# Altium PCB PCI Express_16765X6890_64PIN_Low profile.PCBDOC (part 3 of 5)
Units mm, origin at the board's own origin, x right, y up, seen from the top; angles counter-clockwise.
Board outline 167.65 x 68.9 mm, 6 copper layers (TopLayer, AGround_Layer, InternalPlane1, Power_Layer, Ground_Layer, BottomLayer), stack 1.141 mm thick; 897 components, 648 nets, 2942 pads, 321 vias.
Unrouted connection lines stored in the file: 1996.
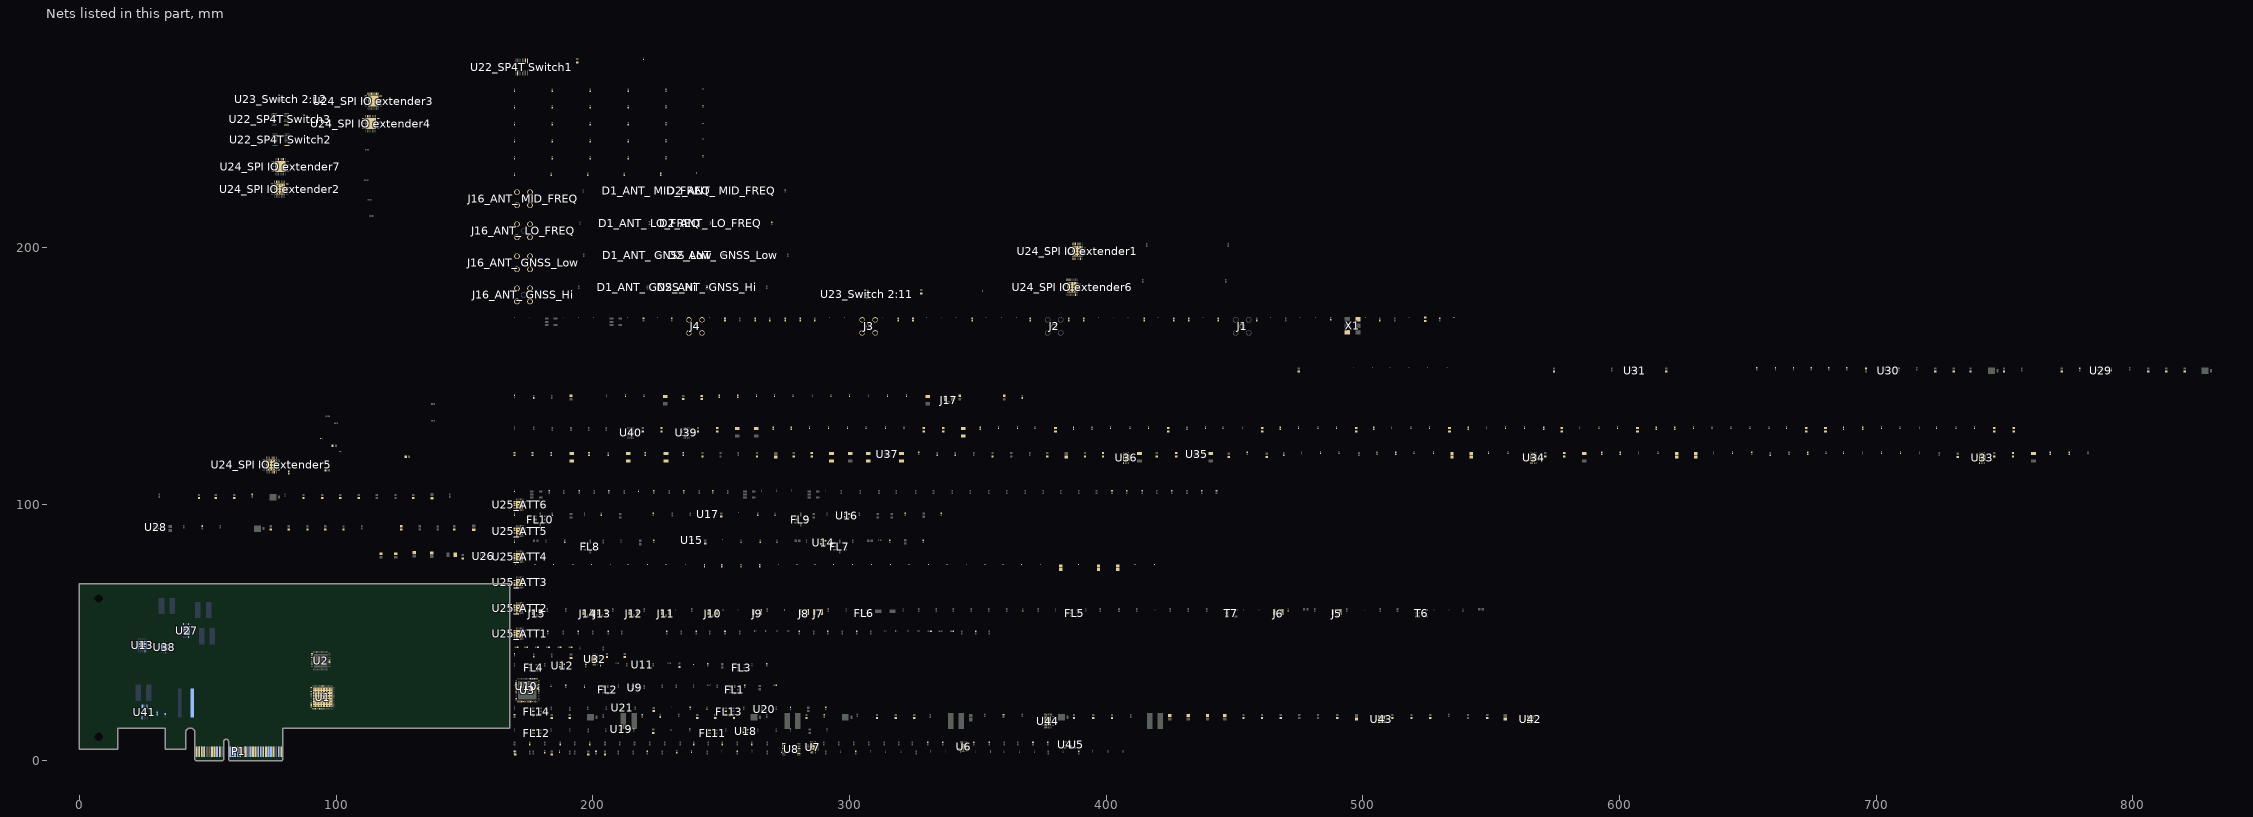
[diagram p5: the nets of this part, all layers, seen from the top]

## Footprints (in the part's own frame and the unit in brackets; to place one, negate y for a bottom-side part, rotate by r counter-clockwise, add the part's x,y. Pads: shape width x height; smd on the part's side, far side on the other; paste and mask are expansions set on the pad) (continued)
"MAX2771 T2855-8" [mm] "MAX2771 T2855-8 QFN, 28-Leads, Body 5,00x5,00mm, Pitch 0,50mm, Thermal Pad 3,25x3,25mm, IPC Medium Density"
  oval 0.95x0.3 smd: 1(-2.34,1.5) 2(-2.34,1) 3(-2.34,0.5) 4(-2.34,0) 5(-2.34,-0.5) 6(-2.34,-1) 7(-2.34,-1.5) 15(2.34,-1.5) 16(2.34,-1) 17(2.34,-0.5) 18(2.34,0) 19(2.34,0.5) 20(2.34,1) 21(2.34,1.5)
  oval 0.3x0.95 smd: 8(-1.5,-2.34) 9(-1,-2.34) 10(-0.5,-2.34) 11(0,-2.34) 12(0.5,-2.34) 13(1,-2.34) 14(1.5,-2.34) 22(1.5,2.34) 23(1,2.34) 24(0.5,2.34) 25(0,2.34) 26(-0.5,2.34) 27(-1,2.34) 28(-1.5,2.34)
  rect 3.25x3.25 smd: 29(0,0)
  silkscreen extent -3.43,-2.65 2.65,2.65, body extent -2.52,-2.52 2.52,2.52, height 0.8
ODS-1415 [mm] "MADP-011029-14150T, PSON, 6-Leads, Body 1,20x1,50mm, Pitch 0,40mm, Thermal Pad 0,85x0,42mm, IPC Medium Density"
  rect 0.4x0.2 smd: 1(-0.65,0.4) 2(-0.65,0) 3(-0.65,-0.4) 4(0.65,-0.4) 5(0.65,0) 6(0.65,0.4)
  rect 0.42x0.85 smd: 7(0,0)
  silkscreen extent -1.11,0.66 -1.01,0.76, body extent -0.75,-0.6 0.75,0.6, height 0.6
PCIeX4-GF-2D-1000-1K-O64 [mm] "Golden finger, PCIeX4, Dual, Opposite, Pitch 1mm, 64-Position"
  rect 0.7x3.2 smd far side paste-1: A1(-9.5,0.5)
  rect 0.7x4.2 smd far side paste-1: A2(-8.5,0) A3(-7.5,0) A4(-6.5,0) A5(-5.5,0) A6(-4.5,0) A7(-3.5,0) A8(-2.5,0) A9(-1.5,0) A10(-0.5,0) A11(0.5,0) A12(3.5,0) A13(4.5,0) A14(5.5,0) A15(6.5,0) A16(7.5,0) A17(8.5,0) A18(9.5,0) A19(10.5,0) A20(11.5,0) A21(12.5,0) A22(13.5,0) A23(14.5,0) A24(15.5,0) A25(16.5,0) A26(17.5,0) A27(18.5,0) A28(19.5,0) A29(20.5,0) A30(21.5,0) A31(22.5,0) A32(23.5,0)
  rect 0.7x4.2 smd paste-1: B1(-9.5,0) B2(-8.5,0) B3(-7.5,0) B4(-6.5,0) B5(-5.5,0) B6(-4.5,0) B7(-3.5,0) B8(-2.5,0) B9(-1.5,0) B10(-0.5,0) B11(0.5,0) B12(3.5,0) B13(4.5,0) B14(5.5,0) B15(6.5,0) B16(7.5,0) B18(9.5,0) B19(10.5,0) B20(11.5,0) B21(12.5,0) B22(13.5,0) B23(14.5,0) B24(15.5,0) B25(16.5,0) B26(17.5,0) B27(18.5,0) B28(19.5,0) B29(20.5,0) B30(21.5,0) B32(23.5,0)
  rect 0.7x3.2 smd paste-1: B17(8.5,0.5) B31(22.5,0.5)
QFN-ML28_N [mm] "QFN, 28-Leads, Body 6x6mm, Pitch 0.65mm, Thermal Pad 4.2x4.2mm, IPC Medium Density"
  oval 1.05x0.3 smd: 1(-2.875,1.95) 2(-2.875,1.3) 3(-2.875,0.65) 4(-2.875,0) 5(-2.875,-0.65) 6(-2.875,-1.3) 7(-2.875,-1.95) 15(2.875,-1.95) 16(2.875,-1.3) 17(2.875,-0.65) 18(2.875,0) 19(2.875,0.65) 20(2.875,1.3) 21(2.875,1.95)
  oval 0.3x1.05 smd: 8(-1.95,-2.875) 9(-1.3,-2.875) 10(-0.65,-2.875) 11(0,-2.875) 12(0.65,-2.875) 13(1.3,-2.875) 14(1.95,-2.875) 22(1.95,2.875) 23(1.3,2.875) 24(0.65,2.875) 25(0,2.875) 26(-0.65,2.875) 27(-1.3,2.875) 28(-1.95,2.875)
  rect 4.2x4.2 smd: 29(0,0)
  silkscreen extent -3.97,-3.2 3.2,3.2, body extent -3.05,-3.05 3.05,3.05, height 1
"RES 0201/0603" [mm]
  rect 0.44x0.35 smd: 1(-0.325,0) 2(0.325,0)
  silkscreen extent -0.7,-0.33 0.7,0.33, body extent -0.3,-0.15 0.3,0.15, height 0.21
"RES 0402/1005 RF" [mm]
  rect 0.7x0.6 smd: 1(-0.45,0) 2(0.45,0)
  silkscreen extent -1.02,-0.51 1.02,0.51, body extent -0.5,-0.25 0.5,0.25, height 0.35
"RES 0603/1608" [mm]
  rect 0.85x0.95 smd: 1(-0.65,0) 2(0.65,0)
  silkscreen extent -1.27,-0.7 1.27,0.7, body extent -0.8,-0.4 0.8,0.4, height 0.45
"RES 0603/1608 RF" [mm]
  rect 0.75x0.85 smd: 1(-0.6,0) 2(0.6,0)
  silkscreen extent -1.2,-0.6 1.2,0.6, body extent -0.8,-0.4 0.8,0.4, height 0.45
"RES 1206/3216" [mm] "Chip Resistor, 2-Leads, Body 3.13x1.55mm, IPC Medium Density"
  rect 1.2x1.65 smd: 1(-1.4,0) 2(1.4,0)
  silkscreen extent -2.3,-1.1 2.3,1.1, body extent -1.57,-0.8 1.62,0.8, height 0.6
"RES 4320 Wide" [mm] "FCSL110, Chip Resistor, 2-Leads, Body 5,60x11,20mm, IPC Medium Density"
  rect 1.4x11.25 smd: 1(-2.475,0) 2(2.475,0)
  silkscreen extent -1.4,-5.53 1.4,5.53, body extent -2.8,-5.6 2.8,5.6, height 0.6
RGV16-2160X2160TP [mm] "QFN, 16-Leads, Body 4x4mm, Pitch 0.65mm, Thermal Pad 2.16x2.16mm, TI Recommended"
  oval 1x0.35 smd paste-0.025 mask+0.07: 1(-1.9,0.975) 2(-1.9,0.325) 3(-1.9,-0.325) 4(-1.9,-0.975) 9(1.9,-0.975) 10(1.9,-0.325) 11(1.9,0.325) 12(1.9,0.975)
  oval 0.35x1 smd paste-0.025 mask+0.07: 5(-0.975,-1.9) 6(-0.325,-1.9) 7(0.325,-1.9) 8(0.975,-1.9) 13(0.975,1.9) 14(0.325,1.9) 15(-0.325,1.9) 16(-0.975,1.9)
  rect 2.16x2.16 smd paste-1.08 mask+0.07: 17(0,0)
  KeepOutLayer region: -2.02,1.3 -1.3,1.3 -1.3,2.02 -2.02,2.02
  silkscreen extent -3,-2.22 2.22,2.22, body extent -2.07,-2.07 2.07,2.07, height 1
RGY0014A_V [mm] "QFN, 14-Leads, Body 3.5x3.5mm, Thermal Pad 2.05x2.05mm, TI Recommend"
  rect 0.85x0.28 smd paste-0.85 mask+0.07: 1(-1.725,-0.75) 7(1.725,-0.75) 8(1.725,0.75) 14(-1.725,0.75)
  rect 0.28x0.85 smd paste-0.85 mask+0.07: 2(-1,-1.725) 3(-0.5,-1.725) 4(0,-1.725) 5(0.5,-1.725) 6(1,-1.725) 9(1,1.725) 10(0.5,1.725) 11(0,1.725) 12(-0.5,1.725) 13(-1,1.725)
  rect 2.05x2.05 smd paste-2.05 mask+0.07: 15(0,0)
  silkscreen extent -2.82,-1.83 1.83,1.83, body extent -1.75,-1.75 1.75,1.75, height 1
RSV0016A [mm] "TXB0304RSVR, UQFN, 16-Leads, Body 1,80x2,60mm, Pitch 0,40mm, IPC Medium Density"
  oval 0.7x0.2 smd: 1(-0.8,0.6) 2(-0.8,0.2) 3(-0.8,-0.2) 4(-0.8,-0.6) 9(0.8,-0.6) 10(0.8,-0.2) 11(0.8,0.2) 12(0.8,0.6)
  oval 0.2x0.7 smd: 5(-0.6,-1.2) 6(-0.2,-1.2) 7(0.2,-1.2) 8(0.6,-1.2) 13(0.6,1.2) 14(0.2,1.2) 15(-0.2,1.2) 16(-0.6,1.2)
  silkscreen extent -1.27,1.58 -1.18,1.67, body extent -0.92,-1.33 0.92,1.33, height 0.55
SDB06A [mm] "SON, 6-Leads, Body 2.2x2.5mm, Pitch 0.65mm, NSC Recommended (SC-70 Land)"
  rect 0.6x0.25 smd paste-0.125 mask+0.051: 1(-1.15,0.65) 2(-1.15,0) 3(-1.15,-0.65) 4(1.15,-0.65) 5(1.15,0) 6(1.15,0.65)
  rect 0.75x1.2 smd paste-0.6 mask+0.051: 7(0,0)
  silkscreen extent -2.27,-1.3 1.6,1.45, body extent -1.3,-1.15 1.3,1.15, height 0.8
SDC08A [mm] "SON, 8-Leads, Body 4x4mm, Pitch 0.8mm, NSC Recommended"
  rect 0.6x0.3 smd paste-0.15 mask+0.051: 1(-1.9,1.2) 2(-1.9,0.4) 3(-1.9,-0.4) 4(-1.9,-1.2) 5(1.9,-1.2) 6(1.9,-0.4) 7(1.9,0.4) 8(1.9,1.2)
  rect 2.6x3 smd paste-1.5 mask+0.051: 9(0,0)
  silkscreen extent -3.02,-2.2 2.35,2.2, body extent -2.05,-2.05 2.05,2.05, height 0.8
SOT403-1 [mm] "SC18IS602B, TSSOP16, 16-Leads, Body 5,00x4,40mm, Pitch 0,65mm, IPC Medium Density"
  oval 1.35x0.4 smd: 1(-2.925,2.275) 2(-2.925,1.625) 3(-2.925,0.975) 4(-2.925,0.325) 5(-2.925,-0.325) 6(-2.925,-0.975) 7(-2.925,-1.625) 8(-2.925,-2.275) 9(2.925,-2.275) 10(2.925,-1.625) 11(2.925,-0.975) 12(2.925,-0.325) 13(2.925,0.325) 14(2.925,0.975) 15(2.925,1.625) 16(2.925,2.275)
  silkscreen extent -3.05,-2.55 1.85,3.15, body extent -3.3,-2.55 3.3,2.55, height 1.1
"TE TP 0805" [mm]
  rect 2.5x1.35 smd: 1(0,0)
  silkscreen extent -1.5,-0.9 1.5,0.9, body extent -1,-0.64 1,0.64, height 1.48
TECO-5-1814400-1_V [mm] "SMA, 5-Leads, Body 6.3x6.3mm, Pitch 5.08mm"
  round 2.1 hole 1.6: 1(0,0)
  round 2.2 hole 1.7: 2(-2.54,2.54) 3(-2.54,-2.54) 4(2.54,-2.54) 5(2.54,2.54)
  silkscreen extent -3.15,-11.05 3.15,3.15, body extent -3.15,-11.08 3.15,3.15, height 13.53
TECO-5-1814832-1_V [mm] "THD, 5-Leads, Body 6.4x6.4mm, Pitch 5.08mm"
  round 2 hole 1.5: 1(0,0)
  round 2.1 hole 1.6: 2(-2.54,2.54) 3(-2.54,-2.54) 4(2.54,-2.54) 5(2.54,2.54)
  silkscreen extent -3.2,-3.2 3.2,3.2, body extent -3.21,-3.21 3.19,3.19, height 9.5
TECO-1909763-1_V [mm] "SMD, 3-Leads, Body 2.6x2.6mm, Height 1.25mm"
  rect 1.05x2.2 smd: 1(-1.475,0) 3(1.475,0)
  rect 1x1.05 smd: 2(0,-1.525)
  silkscreen extent -1.9,-1.77 0.55,1.3, body extent -1.5,-1.55 1.5,1.55, height 1.25
TFS1176 [mm] "TFS 1225C, QFN, 8-Leads, Body 3,00x3,00mm, Pitch 1,20mm, IPC Medium Density"
  rect 1.1x0.6 smd: 1(-1.3,1.2) 2(-1.3,0) 3(-1.3,-1.2) 4(1.3,-1.2) 5(1.3,0) 6(1.3,1.2)
  silkscreen extent -2.07,1.83 -1.82,2.07, body extent -1.52,-1.52 1.52,1.52, height 1.1
"TFS 1225C" [mm] "TFS 1225C, QFN, 8-Leads, Body 3,00x3,00mm, Pitch 1,20mm, IPC Medium Density"
  rect 1x0.6 smd: 1(-1.4,1.2) 2(-1.4,0) 3(-1.4,-1.2) 5(1.4,-1.2) 6(1.4,0) 7(1.4,1.2)
  rect 0.6x1 smd: 4(0,-1.4)
  rect 0.6x1.2 smd: 8(0,1.2)
  silkscreen extent -2.07,1.83 -1.82,2.07, body extent -1.52,-1.52 1.52,1.52, height 1.1
TSNP-6-10-FP [mm] "TSNP-6-10-FP, SOTFL, 6-Leads, Body 1,10x0,80mm, Pitch 0,40mm, IPC Medium Density"
  rect 0.25x0.25 smd: 1(-0.2,0.4) 2(-0.2,0) 3(-0.2,-0.4) 4(0.2,-0.4) 5(0.2,0) 6(0.2,0.4)
  silkscreen extent -0.39,0.8 -0.29,0.9, body extent -0.4,-0.55 0.4,0.55, height 0.37
VG-4513CA [mm] "VG-4513CA, Concave, 6-Leads, Pitch 2,54mm,  Body 7,00x5,00mm,  IPC Medium Density"
  rect 2x1.8 smd: 1(-2.1,2.54) 2(-2.1,0) 3(-2.1,-2.54) 4(2.1,-2.54) 5(2.1,0) 6(2.1,2.54)
  silkscreen extent -3.26,3.28 -3.16,3.38, body extent -2.55,-3.5 2.55,3.5, height 1.6

## Part data
C1 C2 C3 C4 C5 C6 C7 C8 C24 C35 C36 C37 C39 C40 C41 C42 C43 C44 C45 C46 C47 C48 C49 C50 C51 C52 C53 C54 C55 C56 C57 C58 C59 C60 C61 C62 C63 C69 C70 C74 C75 C79 C80 C81 C82 C83 C84 C86 C87 C88 C90 C91 C92 C98 C99 C100 C101 C110 C124 C140 C160_ATT1 C160_ATT2 C160_ATT3 C160_ATT4 C160_ATT5 C160_ATT6 C210 C211 C212 C213 C214 C215 C221 C222 C223 C224 C225 C226 C227 C228 C229 C230 C231 C232 C233 C234 C235 C237 C240 C241 C246 C247 C248 C249 C250 C251 C252 C253 C254 C255 C256 C262 C263 C264 C265 C266 C267 C271 C272 C275 C276 C281 C282 C285 C286 C289 C290 C291 C312 C313 C314 C315 C316 C317 C318 C319 C320 C325 C326 C327 C330 C331 C332 C333 C334 C335 C338 C339 C340 C341 C342 C343 C346 C347 C348 C349 C350 C351 C354 C355 C356 C358 C359 C360 C362 C363 C364 C366 C367 C368 C371 C372 C373 C375 C376 C377 C379 C380 C381: library part Capacitor, "SMT Capacitor", Part Number=GRM033R61C104ME84D, Supplier Part Number 1=490-9986-1-ND, Supplier 1=Digi-Key
C9 C10 C11 C12 C13 C14 C15 C16 C17 C20 C21 C22 C25 C26 C27 C28 C29 C30 C134 C135 C136 C137 C138 C141 C142 C143 C144 C145 C146 C147 C148 C151 C152 C153 C154 C155: library part Capacitor, "SMT Capacitor", Part Number=C0402C330J5GACTU, Supplier Part Number 1=399-1017-1-ND, Supplier 1=Digi-Key
C18 C77 C149 "C156_SP4T Switch1" "C156_SP4T Switch2" "C156_SP4T Switch3": library part Capacitor, "SMT Capacitor", Part Number=0603ZD225MAT2A
C19 C66 C67 C71 C150 "C157_SP4T Switch1" "C157_SP4T Switch2" "C157_SP4T Switch3": library part Capacitor, "SMT Capacitor", Part Number=GRM033R61C104ME84D
C23 C109 C123 C139 "C158_Switch 2:11" "C158_Switch 2:12": library part Capacitor, "SMT Capacitor", Part Number=0603ZD225MAT2A, Supplier Part Number 1=478-7941-1-ND, Supplier 1=Digi-Key
C31 C32 C33: library part Capacitor, "SMT Capacitor", Supplier Part Number 1=587-6012-1-ND, Supplier 1=Digi-Key
C34 C171 C175 C176 C177 C178 C182 C183 C184 C185 C187 C190 C192 C193 C194 C198 C199 C200 C297 C304 C389 C391 C394 C403 C404 C405 C409 C410 C411 C414 C415 C416 C418 C419: library part Capacitor, "SMT Capacitor", Part Number=CL10A475KQ8NNNC, Supplier Part Number 1=1276-1045-1-ND, Parameter 1=6.3V, Supplier 1=Digi-Key
C38 C202 C203 C204 C205 C206 C207 C370: library part Capacitor, "SMT Capacitor", Part Number=C0402C101J5GAC, Supplier Part Number 1=399-6823-1-ND, Supplier 1=Digi-Key
C64 C72: library part Capacitor, "SMT Capacitor", Part Number=GJM0335C1E4R0CB01D
C65 C68 C73: library part Capacitor, "SMT Capacitor", Part Number=GRM0335C1E1R0CD01D
C76 C78: library part Capacitor, "SMT Capacitor", Part Number=0402ZD104KAT2A
C85: library part Capacitor, "SMT Capacitor", Part Number=GJM1555C1H1R7BB01D, Supplier Part Number 1=GJM1555C1H1R7BB01D-ND, Supplier 1=Digi-Key
C89: library part Capacitor, "SMT Capacitor", Supplier Part Number 1=399-14878-1-ND, Supplier 1=Digi-Key
C93 C94 C96 C97: library part Capacitor, "SMT Capacitor", Part Number=C0402C102K5RACTU, Supplier Part Number 1=399-1032-1-ND, Supplier 1=Digi-Key
C95: library part Capacitor, "SMT Capacitor", Part Number=CC0402KRX7R9BB751, Supplier Part Number 1=311-3649-1-ND, Supplier 1=Digi-Key
C102 C103 C104 C105 C108 C112 C113 C115 C117 C118 C119 C120 C125 C126 C128 C129 C162_ATT1 C162_ATT2 C162_ATT3 C162_ATT4 C162_ATT5 C162_ATT6 C163_ATT1 C163_ATT2 C163_ATT3 C163_ATT4 C163_ATT5 C163_ATT6 C164_ATT1 C164_ATT2 C164_ATT3 C164_ATT4 C164_ATT5 C164_ATT6 C165_ATT1 C165_ATT2 C165_ATT3 C165_ATT4 C165_ATT5 C165_ATT6: library part Capacitor, "SMT Capacitor", Manufacturer Part Number=0402N331F500CT, Supplier Part Number 1=1292-1307-1-ND, Supplier 1=Digi-Key
C106 C107 C114 C116: library part Capacitor, "SMT Capacitor", Supplier Part Number 1=81-GRM0335C1H2R5CA1D, Supplier 1=Mouser
C121 C122 C130 C131: library part Capacitor, "SMT Capacitor", Part Number=GRM0335C1ER18BA01J, Supplier Part Number 1=81-GRM0335C1ER18BA1J, Supplier 1=Mouser
"C132_ANT_ GNSS_Hi" "C132_ANT_ GNSS_Low" "C132_ANT_ LO_FREQ" "C132_ANT_ MID_FREQ" "C133_ANT_ GNSS_Hi" "C133_ANT_ GNSS_Low" "C133_ANT_ LO_FREQ" "C133_ANT_ MID_FREQ": library part Capacitor, "SMT Capacitor", Supplier Part Number 1=478-1074-1-ND, Supplier 1=Digi-Key
"C159_Switch 2:11" "C159_Switch 2:12": library part Capacitor, "SMT Capacitor", Part Number=GRM033R61C104ME84D, Supplier Part Number 1=490-9986-6-ND, Supplier 1=Digi-Key
C161_ATT1 C161_ATT2 C161_ATT3 C161_ATT4 C161_ATT5 C161_ATT6 C242 C243 C244 C245 C257 C258 C268 C269 C277 C278 C287 C288 C323 C324 C336 C337 C344 C345 C352 C353 C357 C361 C365 C369 C374 C378 C382: library part Capacitor, "SMT Capacitor", Part Number=AMK105CBJ106MV-F, Supplier Part Number 1=587-3237-1-ND, Supplier 1=Digi-Key
C166 C167 C168 C169 C399 C400 C401 C402: library part Capacitor, "SMT Capacitor", Part Number=CL21A475KOFNNNE, Supplier Part Number 1=1276-1065-6-ND, Parameter 1=16V, Supplier 1=Digi-Key
C170 C186 C298 C305: library part Capacitor, "SMT Capacitor", Part Number=06031C222JAT2A, Supplier Part Number 1=478-3705-1-ND, Supplier 1=Digi-Key
C172 C188 C300 C307 C392 C397: library part Capacitor, "SMT Capacitor", Part Number=C0805C106K8PACTU, Supplier Part Number 1=399-4925-6-ND, Supplier 1=Digi-Key
C173 C174: library part Capacitor, "SMT Capacitor", Part Number=GRM188R60J106ME47D, Supplier Part Number 1=490-3896-1-ND, Supplier 1=Digi-Key
C179 C181 C191 C197 C406 C408 C413 C417: library part Capacitor, "SMT Capacitor", Part Number=CL05C220JB5NNNC, Supplier Part Number 1=1276-1116-1-ND, Supplier 1=Digi-Key
C180 C407: library part Capacitor, "SMT Capacitor", Part Number=CL05A105MQ5NNNC, Supplier Part Number 1=1276-1235-6-ND, Supplier 1=Digi-Key
C189 C412: library part Capacitor, "SMT Capacitor", Part Number=CL10B104KB8NNNC, Supplier Part Number 1=1276-1000-1-ND, Supplier 1=Digi-Key
C195 C196 C201 C208 C209 C216: library part Capacitor, "SMT Capacitor", Part Number=GRM188R71E474KA12, Supplier Part Number 1=490-3291-1-ND, Supplier 1=Digi-Key
C217 C218 C259 C260 C279 C280 C295 C296 C301 C302 C308 C309 C321 C322 C383 C384 C385 C386: library part Capacitor, "SMT Capacitor", Part Number=GRM188R60J475KE19, Supplier Part Number 1=490-4950-1-ND, Supplier 1=Digi-Key
C219 C261 C292 C294 C328: library part Capacitor, "SMT Capacitor", Part Number=GRM188R60J475KE19, Supplier Part Number 1=478-5764-1-ND, Supplier 1=Digi-Key
C220 C270 C293 C303 C329 C387 C388: library part Capacitor, "SMT Capacitor", Part Number=GRM1555C1H102JA01, Supplier Part Number 1=490-3244-1-ND, Supplier 1=Digi-Key
C236 C238 C239 C273 C274 C283 C284: library part Capacitor, "SMT Capacitor", Part Number=GRM21BR61C106KE15L, Supplier Part Number 1=490-3896-1-ND, Supplier 1=Digi-Key
C299 C306 C396: library part Capacitor, "SMT Capacitor", Part Number=C1608X7R1C105K080AC, Supplier Part Number 1=445-1604-1-ND, Supplier 1=Digi-Key
C310 C311: library part Capacitor, "SMT Capacitor", Part Number=0603zd225mat2a, Supplier Part Number 1=478-7941-1-ND, Supplier 1=Digi-Key
C390: library part Capacitor, "SMT Capacitor", Part Number=CL05B152KB5NNNC, Supplier Part Number 1=1276-1521-6-ND, Supplier 1=Digi-Key
C393 C398: library part Capacitor, "SMT Capacitor", Part Number=C0603H103J3GACTU, Supplier Part Number 1=490-9666-1-ND, Supplier 1=Digi-Key
C395: library part Capacitor, "SMT Capacitor", Part Number=CL05B681KB5NNNC, Supplier Part Number 1=1276-1583-6-ND, Supplier 1=Digi-Key
Conn1: library part Resistor, "SMT Resistor", Part Number=Connector, Supplier Part Number 1=SAM9742-ND, Supplier 1=Digi-Key
Conn2: library part Resistor, "SMT Resistor", Part Number=Connector, Supplier Part Number 1=SAM9173-ND, Supplier 1=Digi-Key
"D1_ANT_ GNSS_Hi" "D1_ANT_ GNSS_Low" "D1_ANT_ LO_FREQ" "D1_ANT_ MID_FREQ": Supplier Part Number 1=1465-1738-1-ND, Part Number=MADP-011029-14150T, Supplier 1=Digi-Key
"D2_ANT_ GNSS_Hi" "D2_ANT_ GNSS_Low" "D2_ANT_ LO_FREQ" "D2_ANT_ MID_FREQ": Supplier Part Number 1=1465-1736-1-ND, Supplier 1=Digi-Key
D3 D4 D5 D6 D7 D8 D9 D10: library part MBRM140T1G, Supplier Part Number 1=MBRM140T3GOSCT-ND, Supplier 1=Digi-Key
FB1 FB2 FB3 FB4 FB5 FB6 FB7 FB8 FB9 FB10 FB11 FB12 FB13 FB14 FB15 FB16 FB17 FB18 FB19 FB20 FB21 FB22 FB23: library part "Ferrite Chip", "SMT Ferrite Chip", Supplier Part Number 1=490-1008-1-ND, Supplier 1=Digi-Key
FB24 FB34 FB36 FB38 FB39 FB40 FB41: library part "Ferrite Chip", "SMT Ferrite Chip", Part Number=BLM15AX100SN1D, Supplier Part Number 1=490-5437-1-ND, Supplier 1=Digi-Key
FB25 FB26 FB27 FB28 FB29 FB30 FB31 FB32 FB33 FB35 FB37 FB42 FB55 FB58 FB59: library part "Ferrite Chip", "SMT Ferrite Chip", Part Number=CIC31P121NE, Supplier Part Number 1=1276-6366-1-ND, Supplier 1=Digi-Key
  FB32 FB33 FB35 FB37: Parameter 1=DNI
FB43: library part "Ferrite Chip", "SMT Ferrite Chip", Part Number=BLM31PG330SN1L, Supplier Part Number 1=490-5989-6-ND, Supplier 1=Digi-Key
FB44 FB45 FB46 FB47 FB48 FB49 FB50 FB51 FB52 FB53 FB54 FB56 FB57: library part "Ferrite Chip", "SMT Ferrite Chip", Part Number=CIS10P221NC, Supplier Part Number 1=1276-6350-1-ND, Supplier 1=Digi-Key
J1 J2 "J16_ANT_ GNSS_Hi" "J16_ANT_ GNSS_Low" "J16_ANT_ LO_FREQ" "J16_ANT_ MID_FREQ": "SMA Connector, Pitch 5.08 mm, 1 Position, Height 10.43 mm, Tail Length 3.1 mm, -55 to 85 degC, RoHS, Bulk", Frequency Max=3GHz, Supplier Part Number 1=A97593-ND, Coaxial Cable Types=-, Coaxial Termination=Solder, ComponentLink1Description="Manufacturer URL", ComponentLink1URL=http://www.te.com, ComponentLink2Description=Datasheet, ComponentLink2URL=http://www.onlinecomponents.com/productFiles/mf-AMP/eng_cd_1814400_c1.pdf, Connector Body Style="Right Angle Jack", Connector Mounting="PCB Mount", Connector Type="SMA Coaxial", Contact Material="Beryllium Copper", Contact Plating="Gold Plated Contacts", DatasheetVersion="Rev. C1", Impedance=50ohm, Mounting Technology="Through Hole", PackageDescription="SMA Connector, Pitch 5.08 mm, 1 Position, Height 10.43 mm, Tail Length 3.1 mm", PackageReference=THD, Product Range="ZDC Series", Supplier 1=Digi-Key, SVHC="No SVHC (15-Jun-2015)"
J3 J4: "SMA Connector, Pitch 5.08 mm, 1 Position, Height 9.5 mm, Tail Length 4 mm, -65 to 165 degC, RoHS, Bulk", Frequency Max=3GHz, Supplier Part Number 1=78M7270, Coaxial Cable Types=-, Coaxial Termination=Solder, ComponentLink1Description="Manufacturer URL", ComponentLink1URL=http://www.te.com, ComponentLink2Description=Datasheet, ComponentLink2URL=http://www.onlinecomponents.com/productFiles/mf-AMP/eng_cd_1814832_a.pdf, Connector Body Style="Straight Jack", Connector Mounting="PCB Mount", Connector Type="SMA Coaxial", Contact Material="Beryllium Copper", Contact Plating="Gold Plated Contacts", DatasheetVersion="Rev. B1", Impedance=50ohm, Mounting Technology="Through Hole", PackageDescription="SMA Connector, Pitch 5.08 mm, 1 Position, Height 9.5 mm, Tail Length 4 mm", PackageReference=THD, Product Range="ZDC Series", Supplier 1=Newark, Supplier 2=Newark, Supplier 3=Farnell, Supplier 4=Digi-Key, Supplier Part Number 2=13M4002, Supplier Part Number 3=1248990, Supplier Part Number 4=A97594-ND, SVHC="No SVHC (15-Jun-2015)"
J5 J6 J7 J8 J9 J10 J11 J12 J13 J14 J15: "Ultra Miniature Coaxial Connector Jack, 60 V, 50 Ohm, -40 to 90 degC, RoHS, Tape and Reel", Maximum Frequency="6 GHz", Operating Temperature Range="- 40 C to + 90 C", Supplier Part Number 1=62X0488, Body Material="Liquid Crystal Polymer (LCP)", Brand="TE Connectivity / AMP", ComponentLink1Description="Manufacturer URL", ComponentLink1URL=http://www.te.com, ComponentLink2Description=Datasheet, ComponentLink2URL=http://www.te.com/commerce/DocumentDelivery/DDEController?Action=srchrtrv&DocNm=1909763&DocType=Customer+Drawing&DocLang=English, Contact Material="Copper Alloy", Contact Plating=Gold, DatasheetVersion="Rev. B2", Factory Pack Quantity=5000, Gender="Jack (Female)", Impedance="50 Ohms", Mounting Technology="Surface Mount", Orientation=Straight, PackageDescription="3-Pin Surface Mount Device, Body 2.6 x 2.6 mm", PackageReference=SMD, Packaging=Reel, Product=Connectors, Product Category="RF Connectors / Coaxial Connectors", RF Series=UMCC, RoHS=Details, Supplier 1=Newark, Supplier 2=Farnell, Supplier 3=Digi-Key, Supplier 4=Digi-Key, Supplier 5=Digi-Key, Supplier Part Number 2=2781689, Supplier Part Number 3=A118077TR-ND, Supplier Part Number 4=A118077CT-ND, Supplier Part Number 5=A118077DKR-ND
J17: library part 1909763-1, "Ultra Miniature Coaxial Connector Jack, 60 V, 50 Ohm, -40 to 90 degC, RoHS, Tape and Reel", Maximum Frequency="6 GHz", Operating Temperature Range="- 40 C to + 90 C", Supplier Part Number 1=62X0488, Body Material="Liquid Crystal Polymer (LCP)", Brand="TE Connectivity / AMP", ComponentLink1Description="Manufacturer URL", ComponentLink1URL=http://www.te.com, ComponentLink2Description=Datasheet, ComponentLink2URL=http://www.te.com/commerce/DocumentDelivery/DDEController?Action=srchrtrv&DocNm=1909763&DocType=Customer+Drawing&DocLang=English, Contact Material="Copper Alloy", Contact Plating=Gold, DatasheetVersion="Rev. B2", Factory Pack Quantity=5000, Gender="Jack (Female)", Impedance="50 Ohms", Mounting Technology="Surface Mount", Orientation=Straight, PackageDescription="3-Pin Surface Mount Device, Body 2.6 x 2.6 mm", PackageReference=SMD, Packaging=Reel, Product=Connectors, Product Category="RF Connectors / Coaxial Connectors", RF Series=UMCC, RoHS=Details, Supplier 1=Newark, Supplier 2=Farnell, Supplier 3=Digi-Key, Supplier 4=Digi-Key, Supplier 5=Digi-Key, Supplier Part Number 2=2781689, Supplier Part Number 3=A118077TR-ND, Supplier Part Number 4=A118077CT-ND, Supplier Part Number 5=A118077DKR-ND
L1 L3 L17 L19: library part Inductor, "SMT Inductor", Part Number=HK10058N2J-T, Supplier Part Number 1=445-1466-1-ND, Supplier 1=Digi-Key
L2 L20: library part Inductor, "SMT Inductor", Part Number="Murata LQW15"
L4: library part Inductor, "SMT Inductor", Part Number="Murata LQW"
L5: library part Inductor, "SMT Inductor", Part Number=LQW18AN5N6C80, Supplier Part Number 1=81-LQW18AN5N6C80D, Supplier 1=Mouser
L6: library part Inductor, "SMT Inductor", Part Number=LQW18AN8N4C80, Supplier Part Number 1=LQW18AN8N4C80D-ND, Supplier 1=Digi-Key
L7: library part Inductor, "SMT Inductor", Part Number=LQG15HN82NJ02, Self Resonant Freq=600MHz, Supplier Part Number 1=490-1096-1-ND, Supplier 1=Digi-Key
L8 L9 L10 L11: library part Inductor, "SMT Inductor", Supplier Part Number 1=490-6936-1-ND, Supplier 1=Digi-Key
L12: library part Inductor, "SMT Inductor", Part Number=LQW18AN82NG00, Supplier Part Number 1=490-6912-1-ND, Supplier 1=Digi-Key
L13 L14 L15 L16: library part Inductor, "SMT Inductor", Part Number=LQW18ANR39G00, Supplier Part Number 1=490-6935-1-ND, Supplier 1=Digi-Key
L18: library part Inductor, "SMT Inductor", Part Number=LQW15AN9N4J8ZD, Supplier Part Number 1=490-15616-6-ND, Supplier 1=Digikey
L21: library part Inductor, "SMT Inductor", Part Number=LQM31PN1R0M00, Supplier Part Number 1=490-4039-1-ND, Supplier 1=Digi-Key
L22 L25 L27 L30 L31: Inductance [µH]=8.2, Part Number=CDRH5D28NP-8R2, Supplier Part Number 1=308-2309-1-ND, Supplier 1=Digi-Key
L23 L28: library part Inductor, "SMT Inductor", Supplier Part Number 1=445-6151-1-ND, Supplier 1=Digi-Key
L24 L26 L29: Inductance="4.2 µH", Supplier Part Number 1=308-2193-1-ND, Supplier 1=Digi-Key
P1: library part CMP-0001-00031-2, "Golden finger, PCIeX4, Dual, Opposite, Pitch 1mm, 64-Position", ClassName="Edge Connector", Datasheet Version="rev2.0, Apr-2007", Mating Connector=Molex-87715-9106, Package Reference=PCIeX4-GF-2D-1000-1K-O64, Publisher=Altium
R1 R2 R3 R4 R5 R6 R7 R8 R9 R10 R11 R12 R17 R18 R19 R20 R21 R22 R23 R24 R25 R26 R27 R28 R29 R30 R36 R37 R38 R39 R40 R41 R42 R43 R44 R45 R46 R47 R48 R49 R50 R51 R52 R53 R54 R55 R56 R57 R58 R59 R60 R61 R62 R63 R64 R65 R66 R67 R125 R126 R127 R128 R129 R130 R131 R132 R133 R134 R135 R136 "R170_SPI IO extender1" "R170_SPI IO extender2" "R170_SPI IO extender3" "R170_SPI IO extender4" "R170_SPI IO extender5" "R170_SPI IO extender6" "R170_SPI IO extender7" "R171_SPI IO extender1" "R171_SPI IO extender2" "R171_SPI IO extender3" "R171_SPI IO extender4" "R171_SPI IO extender5" "R171_SPI IO extender6" "R171_SPI IO extender7" R175 R178 R182 R184 R205 R206 R212 R214 R217 R219: library part Resistor, "SMT Resistor", Supplier Part Number 1=RR05P10.0KDCT-ND, Supplier 1=Digi-Key
R31 R32 R33 R34 R35 R69 R71 R72 R73 R75 R76 R77 R78 R85 R86 R92 R93 R97 R99 R101 R109 R111 R140 R142 R146 R147 R148 R149 R150 R151 R152 R153 R154 R155 R156 R157 R158 R159 R160 R161 R163 R165 R167 R169: library part Resistor, "SMT Resistor", Supplier Part Number 1=311-0.0JRCT-ND, Supplier 1=Digi-Key
R68 R70 R162 R164 R166 R168: library part Resistor, "SMT Resistor", Supplier Part Number 1=P15.0HCT-ND, Supplier 1=Digi-Key
R74 R80 R81 R84 R88 R91 R94 R96: library part Resistor, "SMT Resistor", Supplier Part Number 1=RR05R51DCT-ND, Supplier 1=Digi-Key
R79 R83 R87 R90: library part Resistor, "SMT Resistor", Supplier Part Number 1=A129620CT-ND, Supplier 1=Digi-Key
R82 R89 R95: library part Resistor, "SMT Resistor", Supplier Part Number 1=311-100LRDKR-ND, Supplier 1=Digi-Key
R98 R100 R103 R107 R108 R110: library part Resistor, "SMT Resistor", Part Number=ERJ-1GNF10R0C
R102 R106: library part Resistor, "SMT Resistor", Part Number=ERJ-1GEF49R9C
R104 R105 R113: library part Resistor, "SMT Resistor"
R112 R117 R120 R124: library part Resistor, "SMT Resistor", Part Number=NRC04F4R99TRF
R114 R116 R118 R119 R121 R123: library part Resistor, "SMT Resistor", Part Number=CRCW040224R9FKED
R115 R122: library part Resistor, "SMT Resistor", Part Number=NRC02F1000TRF
R137 R139 R141 R144: library part Resistor, "SMT Resistor", Part Number=CRCW04021K00FK, Supplier Part Number 1=541-1.00KLDKR-ND, Supplier 1=Digi-Key
R138 R143: library part Resistor, "SMT Resistor", Part Number=CRCW0402200RFK, Supplier Part Number 1=541-200LCT-ND, Supplier 1=Digi-Key
R145: library part Resistor, "SMT Resistor", Part Number=ERJ-2GEJ153, Supplier Part Number 1=P15KJCT-ND, Supplier 1=Digi-Key
R172 R177: library part Resistor, "SMT Resistor", Part Number=ERA-3AEB224V, Supplier Part Number 1=P220KDBCT-ND, Supplier 1=Digi-Key
R173 R186 R188: library part Resistor, "SMT Resistor", Supplier Part Number 1=RR05P24.9KDCT-ND, Supplier 1=Digi-Key
R174 R179: library part Resistor, "SMT Resistor", Part Number=ERA-3AEB3922V, Supplier Part Number 1=P39.2KDBCT-ND, Supplier 1=Digi-Key
R176: library part Resistor, "SMT Resistor", Supplier Part Number 1=RR05P12.4KDCT-ND, Supplier 1=Digi-Key
R180: library part Resistor, "SMT Resistor", Supplier Part Number 1=RR05P39.0KDCT-ND, Supplier 1=Digi-Key
R181 R216: library part Resistor, "SMT Resistor", Supplier Part Number 1=RR05P18.2KDCT-ND, Supplier 1=Digi-Key
R183 R213: library part Resistor, "SMT Resistor", Supplier Part Number 1=RNCF0402DTE21K5CT-ND, Supplier 1=Digikey
R185 R187 R198 R200 R201: library part Resistor, "SMT Resistor", Supplier Part Number 1=RR05P100KDCT-ND, Supplier 1=Digi-Key
R189 R191 R192 R195: library part Resistor, "SMT Resistor", Supplier Part Number 1=RR08P4.99KDDKR-ND, Supplier 1=Digi-Key
R190 R193 R194 R196: library part Resistor, "SMT Resistor", Supplier Part Number 1=RR12P3.32KDCT-ND, Supplier 1=Digi-Key
R197 R208 R210: library part Resistor, "SMT Resistor", Supplier Part Number 1=RR05P1.0KDCT-ND, Supplier 1=Digi-Key
R199 R203: library part Resistor, "SMT Resistor", Supplier Part Number 1=311-2278-1-ND, Supplier 1=Digi-Key
R202: library part Resistor, "SMT Resistor", Supplier Part Number 1=RMCF0402FT17K8CT-ND, Supplier 1=Digi-Key
R204: library part Resistor, "SMT Resistor", Part Number=FCSL110R005FER, Supplier Part Number 1=FCSL110R005FERCT-ND, Supplier 1=Digi-Key
R207: library part Resistor, "SMT Resistor", Supplier Part Number 1=RMCF0402FT1K80CT-ND, Supplier 1=Digi-Key
R209: library part Resistor, "SMT Resistor", Supplier Part Number 1=RR05P4.02KDCT-ND, Supplier 1=Digi-Key
R211 R215: library part Resistor, "SMT Resistor", Supplier Part Number 1=RNCF0402DTE34K8CT-ND, Supplier 1=Digikey
R218: library part Resistor, "SMT Resistor", Supplier Part Number 1=RMCF1/16S59KFR-ND, Supplier 1=Digi-Key
T1 T2 T6 T7: Supplier Part Number 1=1465-1317-1-ND, Supplier 1=Digi-Key
T3 T4 T5: Supplier Part Number 1=1465-1302-1-ND, Supplier 1=Digi-Key
U1: Supplier Part Number=AD9690BCPZ-500-ND, Supplier=Digi-Key, Supplier 1=Digi-Key, Supplier Part Number 1=AD9690BCPZ-500-ND
U2: Supplier Part Number 1=LTC2122CUK#PBF-ND, Supplier 1=Digi-Key
U3: Supplier Part Number 1=296-48594-1-ND, Part Number=LMK04610, Supplier 1=Digi-Key, URL=http://www.ti.com/product/LMK04610
U4 U5: Supplier Part Number 1=296-29681-1-ND, Supplier 1=Digi-Key
U6: "Single Power Supply Quadruple Buffer GATE w/ 3-State Output CMOS Logic Level Shifter, RGY0014A, LARGE T&R", F @ Nom Voltage(Max)(Mhz)=50, Generic Part Number=SN74LV4T125, ICC @ Nom Voltage(Max)(mA)=0.02, Manufacturer="Texas Instruments", Operating Temperature Range(C)="-40 to 125", Rating=Catalog, Supplier Part Number 1=595-SN74LV4T125RGYR, tpd @ Nom Voltage(Max)(ns)=12,7,5.5,3.5, Voltage(Nom)(V)=1.8,2.5,3.3,5, 3-State Output=Yes, Bits(#)=4, ComponentLink1Description="Manufacturer URL", ComponentLink1URL=http://www.ti.com/, ComponentLink2Description=Datasheet, ComponentLink2URL=http://www.ti.com/lit/ds/symlink/sn74lv4t125.pdf, DatasheetVersion=SCLS749B, Input Type=CMOS/TTL, Logic=True, Output Drive (IOL/IOH)(Max)(mA)=16/-16, Output Type=CMOS, PackageReference=RGY0014A, PartNumber=SN74LV4T125RGYR, Schmitt Trigger=No, Sub-Family="Single Supply Translator", Supplier 1=Mouser, Supplier 2=Digi-Key, Supplier 3=Digi-Key, Supplier 4=Digi-Key, Supplier Part Number 2=296-40546-2-ND, Supplier Part Number 3=296-40546-1-ND, Supplier Part Number 4=296-40546-6-ND, Technology Family=LV-A, VCC(Max)(V)=5.5, VCC(Min)(V)=1.6
U7: "4-Channel I2C and SMBus Multiplexer with Reset Functions, 2.3 to 5.5 V, -40 to 85 degC, 16-pin VQFN (RGV), Green (RoHS & no Sb/Br)", 5V Tolerant I/O=Yes, Manufacturer="Texas Instruments", Max Frequency(kHz)=400, Supplier Part Number 1=PCA9546ARGVRG4-ND, Channel Width=4, ComponentLink1Description=Datasheet, ComponentLink1URL=http://www.ti.com/general/docs/lit/getliterature.tsp?genericPartNumber=PCA9546A&fileType=pdf, ComponentLink2Description="Package Specification", ComponentLink2URL=http://www.ti.com/litv/pdf/mpds178g, DatasheetVersion=SCPS148E, Eco-Plan="Green (RoHS & no Sb/Br)", fSCLK(Max)(MHz)="100, 400", I2C Address="1110 xxx", Mounting Technology="Surface Mount", Open Drain I/O Type=Yes, PackageDescription="16-Pin Plastic Quad Flat No-Lead, 4 x 4 mm Body, 0.65 mm Pitch, 2.16 x 2.16 mm Exposed Pad", PackageReference=RGV16-2160X2160TP, PackageVersion="revF, Jun-2011", PartNumber=PCA9546ARGVRG4, Reset Input=Yes, Simultaneously Active Channels="1 to 4", SubFamily="I2C Multiplexer, Switch", Supplier 1=Digi-Key, Supplier 2=Mouser, Supplier Part Number 2=595-PCA9546ARGVRG4, tpd max(ns)="0.3, 1", VCC(Max)(V)=5.5, VCC(Min)(V)=2.3, Vcc range(V)="2.3 to 5.5"
U8: Supplier Part Number 1=568-13691-1-ND, Supplier 1=Digi-Key
U9 U12 U14 U16 U18 U20: "Silicon Germanium Broadband MMIC Amplifier, DC-6 GHz, 17.5 dB Gain, SOT343, Green", Frequency (f)="DC-6 GHz", Manufacturer=Infineon, Supplier Part Number 1=N/A, ComponentLink1Description="Manufacturer URL", ComponentLink1URL=http://www.infineon.com/, ComponentLink2Description=Datasheet, ComponentLink2URL=http://www.infineon.com/dgdl/BGA616.pdf?folderId=db3a30431441fb5d0114b654e6581730&fileId=db3a304314dca3890115419102bb163b&location=en.Products.RF.RF_MMIC.CATV___Broadband_Amplifier.DATASHEET.BGA616.pdf, ComponentLink3Description="Package Specification", ComponentLink3URL=http://www.infineon.com/dgdl/SOT343-Package_Overview.pdf?folderId=db3a30431936bc4b0119535155343cba&fileId=db3a30431936bc4b0119535a9f393cd3, DatasheetVersion="Rev. 2.1", F (typ)="2.9 dB", Gain (typ)="17.5 dB", Green=yes, Halogen-free=yes, I (typ)="60 mA", Mounting Technology="Surface Mount", P-1dB (in)=+18, PackageDescription="4-Pin Small Outline Transistor Package, 1.25 x 2 mm Body", PackageReference=SOT343, PartNumber=BGA616, Supplier 1=Mouser, Supplier 2=Digi-Key, Supplier Part Number 2=BGA616H6327XTSA1CT-ND
U10 U19 U21: Frequency range="1164 - 1300 MHz", Icc max=16mA, Part Number=BGA855N6, URL=https://www.infineon.com/dgdl/Infineon-BGA855N6-DS-v01_00-EN.pdf?fileId=5546d462677d0f460167a32ebeb1141d, Vcc="1.1 to 3.3V"
U11: Operating Frequency="1550 - 1615 MHz", Supplier Part Number 1=BGA524N6E6327XTSA1DKR-ND, Gain="16,6 dBm", Icc=16mA, Part Number=BGA524N6, Supplier 1=Digi-Key, URL=https://www.infineon.com/dgdl/Infineon-BGA524N6-DS-v03_00-en.pdf?fileId=db3a304344e406b50144e44dfad302b9, Vcc="1.5 - 3.3V"
U13: Supplier Part Number 1=MAX2771ETI+-ND, Supplier 1=Digi-Key
U15 U17: Frequency=70-1000GHz, Supplier Part Number 1=BGA729N6E6327XTSA1CT-ND, Icc=16mA, Part Number=BGA729N6, Supplier 1=Digi-Key, Vcc="1.1 - 3.3V"
"U23_Switch 2:11" "U23_Switch 2:12": Supplier Part Number 1=ADG918BCPZ-REEL7CT-ND, Idd(max) [mA]=0.001, Supplier 1=Digi-Key
"U24_SPI IO extender1" "U24_SPI IO extender2" "U24_SPI IO extender3" "U24_SPI IO extender4" "U24_SPI IO extender5" "U24_SPI IO extender6" "U24_SPI IO extender7": "16-Bit I/O Expander with Serial Interface, 28-Pin QFN, Extended Temperature", Manufacturer=Microchip, Supplier Part Number 1=MCP23017-E/ML-ND, Code_JEDEC=MO-220, ComponentLink1Description="Manufacturer URL", ComponentLink1URL=http://www.microchip.com/, ComponentLink2Description=Datasheet, ComponentLink2URL=http://ww1.microchip.com/downloads/en/DeviceDoc/21952b.pdf, ComponentLink3Description="Package Specification", ComponentLink3URL=http://www.microchip.com/stellent/groups/techpub_sg/documents/packagingspec/en012702.pdf, DatasheetVersion="revB, Feb-2007", Mounting Technology="Surface Mount", PackageDescription="28-Lead Plastic Quad Flat, No Lead Package (ML) - 6x6 mm Body [QFN] with 0.55 mm Contact Length", PackageReference=QFN-ML28, PackageVersion="revBB, Aug-2009", PartNumber=MCP23017-E/ML, Supplier 1=Digi-Key, Supplier 2=Newark, Supplier 3=Mouser, Supplier Part Number 2=31K2957, Supplier Part Number 3=579-MCP23017-E/ML
U25_ATT1 U25_ATT2 U25_ATT3 U25_ATT4 U25_ATT5 U25_ATT6: Supplier Part Number 1=1127-3157-ND, Idd (max) [mA]=3, Parameter 1="ATT max 31.5dB step 0.5dB", Part Number=HMC472ALP4E, Supplier 1=Digi-Key, URL=https://www.analog.com/media/en/technical-documentation/data-sheets/hmc472a.pdf
U26 U28 U35 U37: "500 mA, Low Quiescent Current, CMOS Linear Regulator, 2.3 to 5.5 V Vin, 0.8 to 5 V Vout, Industrial, 8-pin SON (CP-8-8), Reel", Manufacturer="Analog Devices", Supplier Part Number 1=ADP125ACPZ-R7TR-ND, Supply Current IGND @ Small Load=45uA, ComponentLink1Description="Manufacturer URL", ComponentLink1URL=http://www.analog.com/en/index.html, ComponentLink2Description=Datasheet, ComponentLink2URL=http://www.analog.com/static/imported-files/data_sheets/ADP124_125.pdf, ComponentLink3Description="Package Specification", ComponentLink3URL=http:/www.analog.com/static/imported-files/packages/PKG_PDF/LFCSP(CP)/CP_8_8.pdf, ComponentLink4Description="URL Link1", ComponentLink4URL="Product URL:http://www.analog.com/en/ADP125/productSearch.html", DatasheetVersion="Rev. C", Iout max=500mA, Mounting Technology="Surface Mount", PackageDescription="8-Pin Lead Frame Chip Scale Package, Body 2 x 2 mm, Pitch 0.5 mm", PackageReference=CP-8-8, PackageVersion="101028-A, 10/2008", Packing=Reel, PartNumber=ADP125ACPZ-R7, Supplier 1=Digi-Key, Supplier 2=Digi-Key, Supplier 3=Digi-Key, Supplier 4=Newark, Supplier 5=Mouser, Supplier Part Number 2=ADP125ACPZ-R7CT-ND, Supplier Part Number 3=ADP125ACPZ-R7DKR-ND, Supplier Part Number 4=18T2009, Supplier Part Number 5=584-ADP125ACPZ-R7, Vin (max) (V)=5.5, Vin (min) (V)=2.3, Vout Adjustable Range="0.8V to 5V"
U27 U44: "Quad 40 V / 1 A Step-Down Switching Regulator with 100% Duty Cycle Operation, 28-pin QFN (UFD-28), -40 to 125 degC, Pb-Free", Manufacturer="Linear Technology", Supplier Part Number 1=LT3504EUFD#PBF-ND, Code_JEDEC=MO-220, ComponentLink1Description="Manufacturer URL", ComponentLink1URL=http://www.linear.com/, ComponentLink2Description=Datasheet, ComponentLink2URL=http://cds.linear.com/docs/en/datasheet/3504fa.pdf, ComponentLink3Description="Package Specification", ComponentLink3URL=http://cds.linear.com/docs/en/packaging/QFN_28_05-08-1712.pdf, Mounting Technology="Surface Mount", Number of Outputs=4, PackageDescription="28-Pin Plastic QFN, Body 5 x 4 mm, Pitch 0.5 mm", PackageReference=UFD-28, PackageVersion="Rev. B, 06/2010", PartNumber=LT3504EUFD#PBF, RoHS=TRUE, Supplier 1=Digi-Key, Supplier 2=Farnell, Supplier 3=Newark, Supplier Part Number 2=2215129, Supplier Part Number 3=27W9523
U29 U30: "Ultra Low Noise, 150mA Linear Regulator for RF/Analog Circuits Requires No Bypass Capacitor, 6-pin LLP", Manufacturer="National Semiconductor", PackageTopMarking=XTT*L13, PowerWise=N, Supplier Part Number 1=LP5900SD-2.5/NOPBDKR-ND, ComponentLink1Description="Manufacturer URL", ComponentLink1URL=http://www.national.com/, ComponentLink2Description="LP5900 Datasheet", ComponentLink2URL=http://www.national.com/ds/LP/LP5900.pdf, ComponentLink3Description="LP5900 Web Page", ComponentLink3URL=http://www.national.com/pf/LP/LP5900.html, ComponentLink4Description="SDB06A Package Page", ComponentLink4URL=http://www.national.com/packaging/folders/sdb06a.html, CompType="LDO IC", DatasheetVersion=Jul-2010, High-Reliability=Y, PackageDescription="LLP, Plastic, Dual, 2.2 x 2.5 x 0.8mm Body, 6 Lead, 0.65mm Pitch, No Pullback", PackageReference=SDB06A, PackageVersion="revA, Nov-2003", PartNumber=LP5900SD-2.5, PinCount=6, RoHS=N, Supplier 1=Digi-Key
U31: "Ultra Low Noise, 150mA Linear Regulator for RF/Analog Circuits Requires No Bypass Capacitor, 6-pin LLP", Manufacturer="National Semiconductor", PackageTopMarking=XTT*L12, PowerWise=N, Supplier Part Number 1=LP5900SD-2.8/NOPBCT-ND, ComponentLink1Description="Manufacturer URL", ComponentLink1URL=http://www.national.com/, ComponentLink2Description="LP5900 Datasheet", ComponentLink2URL=http://www.national.com/ds/LP/LP5900.pdf, ComponentLink3Description="LP5900 Web Page", ComponentLink3URL=http://www.national.com/pf/LP/LP5900.html, ComponentLink4Description="SDB06A Package Page", ComponentLink4URL=http://www.national.com/packaging/folders/sdb06a.html, CompType="LDO IC", DatasheetVersion=Jul-2010, High-Reliability=Y, PackageDescription="LLP, Plastic, Dual, 2.2 x 2.5 x 0.8mm Body, 6 Lead, 0.65mm Pitch, No Pullback", PackageReference=SDB06A, PackageVersion="revA, Nov-2003", PartNumber=LP5900SD-2.8, PinCount=6, RoHS=N, Supplier 1=Digi-Key
U32 U33 U34 U36 U38: "2 A, Low VIN, Low Dropout Linear Regulator, 1.6 to 3.6 V Vin, 0.75 to 3 V Vout, Industrial, 16-pin QFN (CP-16-13), Reel", Manufacturer="Analog Devices", Supplier Part Number 1=ADP1741ACPZ-R7TR-ND, Supply Current IGND @ Small Load=90uA, Code_JEDEC=MO-220-VGGC., ComponentLink1Description="Manufacturer URL", ComponentLink1URL=http://www.analog.com/en/index.html, ComponentLink2Description=Datasheet, ComponentLink2URL=http://www.analog.com/static/imported-files/data_sheets/ADP1740_1741.pdf, ComponentLink3Description="Package Specification", ComponentLink3URL=http://www.analog.com/static/imported-files/packages/PKG_PDF/LFCSP(CP)/CP-16/CP_16_13.pdf, ComponentLink4Description="URL Link1", ComponentLink4URL="Product URL:http://www.analog.com/en/ADP1741/productSearch.html", DatasheetVersion="Rev. D", Iout max=2A, Mounting Technology="Surface Mount", PackageDescription="16-Pin Lead Frame Chip Scale Package, Body 4 x 4 mm, Pitch 0.65 mm", PackageReference=CP-16-13, PackageVersion="031006-A, 06/2006", Packing=Reel, PartNumber=ADP1741ACPZ-R7, Supplier 1=Digi-Key, Supplier 2=Digi-Key, Supplier 3=Digi-Key, Supplier 4=Newark, Supplier 5=Newark, Supplier 6=Mouser, Supplier Part Number 2=ADP1741ACPZ-R7CT-ND, Supplier Part Number 3=ADP1741ACPZ-R7DKR-ND, Supplier Part Number 4=72W4083, Supplier Part Number 5=34P3050, Supplier Part Number 6=584-ADP1741ACPZ-R7, Vin (max) (V)=3.6, Vin (min) (V)=1.6, Vout Adjustable Range="0.75V to 3.3V"
U39 U40: "0.8 A, Low VIN, Low Dropout Linear Regulator, 1.6 to 3.6 V Vin, 0.75 to 3 V Vout, Industrial, 16-pin QFN (CP-16-4), Reel", Manufacturer="Analog Devices", Supplier Part Number 1=ADP1753ACPZ-R7TR-ND, Supply Current IGND @ Small Load=90uA, Code_JEDEC=MO-220-VGGC, ComponentLink1Description="Manufacturer URL", ComponentLink1URL=http://www.analog.com/en/index.html, ComponentLink2Description=Datasheet, ComponentLink2URL=http://www.analog.com/static/imported-files/data_sheets/ADP1752_1753.pdf, ComponentLink3Description="Package Specification", ComponentLink3URL=http://www.analog.com/static/imported-files/packages/46009454504174339653421710019CP_16_4.pdf, ComponentLink4Description="URL Link1", ComponentLink4URL="Product URL:http://www.analog.com/en/ADP1753/productSearch.html", DatasheetVersion="Rev. D", Iout max=800mA, Mounting Technology="Surface Mount", PackageDescription="16-Pin Lead Frame Chip Scale Package, Body 4 x 4 mm, Pitch 0.65 mm", PackageReference=CP-16-4, PackageVersion="010606-0, 01/2006", Packing=Reel, PartNumber=ADP1753ACPZ-R7, Supplier 1=Digi-Key, Supplier 2=Digi-Key, Supplier 3=Digi-Key, Supplier 4=Newark, Supplier 5=Mouser, Supplier Part Number 2=ADP1753ACPZ-R7CT-ND, Supplier Part Number 3=ADP1753ACPZ-R7DKR-ND, Supplier Part Number 4=34P3059, Supplier Part Number 5=584-ADP1753ACPZ-R7, Vin (max) (V)=3.6, Vin (min) (V)=1.6, Vout Adjustable Range="0.75V to 3.3V"
U41: Supplier Part Number 1=296-29100-1-ND, Supplier 1=Digi-Key
U42 U43: "Micropower 800mA Low Noise \"Ceramic Stable\" Adjustable Voltage Regulator for 1V to 5V Applications, 8-pin LLP, Pb-Free", Manufacturer="National Semiconductor", PackageTopMarking=NS*UZXYTT*3878ADJ, PowerWise=N, Supplier Part Number 1=LP3878SD-ADJ/NOPBCT-ND, ComponentLink1Description="Manufacturer URL", ComponentLink1URL=http://www.national.com/, ComponentLink2Description="LP3878-ADJ Datasheet", ComponentLink2URL=http://www.national.com/ds/LP/LP3878-ADJ.pdf, ComponentLink3Description="LP3878-ADJ Web Page", ComponentLink3URL=http://www.national.com/pf/LP/LP3878-ADJ.html, ComponentLink4Description="SDC08A Package Page", ComponentLink4URL=http://www.national.com/packaging/folders/sdc08a.html, CompType="LDO IC", DatasheetVersion=May-2005, High-Reliability=Y, PackageDescription="LLP, Plastic, Dual, 4 x 4 x 0.8mm Body, 8 Lead, 0.8mm Pitch, No Pullback", PackageReference=SDC08A, PackageVersion="revA, Jun-2003", PartNumber=LP3878SD-ADJ/NOPB, PinCount=8, RoHS=Y, Supplier 1=Digi-Key
X1: Freq="125 MHz", Supplier Part Number 1=SER4219DKR-ND, Supplier 1=Digi-Key
FL1 FL2: BW=±59MHz, Fc=1225MHz, Part Number="TFS 1225C", URL=https://www.vectron.com/products/saw/pdf_saw/TFS1225C.pdf
FL3 FL4 FL5: BW=±17.5MHz, Fc=1575MHz, Part Number=TFS1575Z
FL6 FL11 FL12: BW="±12.5 MHz", Fc="1176 MHz"
FL7 FL8: BW=±2MHz, Fc=110MHz, Part Number="TFS 110A", URL=https://www.vectron.com/products/saw/pdf_saw/TFS110A.pdf
FL9 FL10: BW=±20MHz, Fc=420MHz, Part Number="TFS 420D", URL=https://www.vectron.com/products/saw/pdf_saw/TFS420D.pdf
FL13 FL14: BW="±6.5 MHz", Fc="1206 MHz"
"U22_SP4T Switch1" "U22_SP4T Switch2" "U22_SP4T Switch3": Part Number=HMC241AQS16, URL=https://www.analog.com/media/en/technical-documentation/data-sheets/hmc241aqs16e.pdf

## Free pads (board coordinates)
  round 2.88 hole 3.18 unplated: MH1(7.5,9.35) MH2(7.5,63.25)

## Via types
v1: diameter 0.5, hole 0.2, TopLayer to BottomLayer, 309 vias
v2: diameter 0.5, hole 0.2, TopLayer to BottomLayer, tented top, 8 vias
v3: diameter 0.5, hole 0.3, TopLayer to BottomLayer, 4 vias

## Nets (pads, with @x,y where several pads share a name; then routed paths per layer and width w, separated by ;. In a path a pad name is that pad's centre, name@x,y a point inside that pad or via, vN(x,y) a via of type N, cw(c..) or ccw(c..) an arc to the next point about the centre after c; other vN are vias at no path point)
3.3Vaux: P1.B10 R29.2 R30.2 U4.13 U5.13
2122_0VDD: C325.2 C326.2 C327.2 FB43.2 U2.25
2122_CS: R35.2 U2.46 U8.10
2122_VCC: C312.2 C313.2 C314.2 C315.2 C316.2 C317.2 C318.2 C319.2 C320.2 C322.2 C323.2 C324.2 FB42.2 R197.1 U2.1
2771_CS: U6.13 U8.13 U13.9
4610_Coarse_Voltage: C333.2 C334.2 C341.2 C342.2 C346.2 C347.2 C354.2 C355.2 C362.2 C363.2 C371.2 C372.2 C375.2 C376.2 C379.2 C380.2 C386.2 FB45.1 FB47.1 FB48.1 FB50.1 FB52.1 FB54.1 FB56.1 FB57.1 FB59.2
4610_Core: C332.2 C336.2 FB44.2 U3.8
04610_CS: R33.2 U3.12 U6.1 U8.1
4610_Fine_Voltage: C330.2 C331.2 C338.2 C339.2 C349.2 C350.2 C358.2 C359.2 C366.2 C367.2 C384.2 FB44.1 FB46.1 FB49.1 FB51.1 FB53.1 FB58.2
4610_IO: C335.2 C337.2 FB45.2 U3.31
4610_O1_2: C343.2 C345.2 FB47.2 U3.20
4610_O3_4: C348.2 C352.2 FB48.2 U3.25
4610_O5: C356.2 C357.2 FB50.2 U3.28
4610_O6: C364.2 C365.2 FB52.2 U3.43
4610_O7_8: C373.2 C374.2 FB54.2 U3.46
4610_O9_10: C377.2 C378.2 FB56.2 U3.51
4610_OSC: C381.2 C382.2 FB57.2 U3.37
4610_PLL1: C340.2 C344.2 FB46.2 U3.40
4610_PLL2_Core: C360.2 C361.2 FB51.2 U3.6
4610_PLL2_OSC: C351.2 C353.2 FB49.2 U3.4
04610_Reset: "U24_SPI IO extender3.23" U3.15
04610_Stat0: "U24_SPI IO extender3.24" U3.9 U6.2
04610_Stat1: "U24_SPI IO extender3.3" U3.10
4610_VCC_VCXO: C368.2 C369.2 C370.2 FB53.2 X1.6
9690_AGND_SR: C271.1 C272.1 C273.1 C274.1 C275.1 C276.1 C277.1 C278.1 C299.1 C300.1 C301.1 C302.1 FB35.1 R193.1 U1.56 U35.4
9690_AVDD1: C246.2 C247.2 C248.2 C249.2 C250.2 C251.2 C252.2 C253.2 C254.2 C255.2 C256.2 C257.2 C258.2 C280.2 FB26.2 U1.1
9690_AVDD1_PG: "U24_SPI IO extender1.18" U34.5
9690_AVDD1_SR: C271.2 C272.2 C273.2 C274.2 C275.2 C276.2 C277.2 C278.2 C302.2 FB28.2 U1.57
9690_AVDD2: C221.2 C222.2 C223.2 C224.2 C225.2 C226.2 C227.2 C228.2 C229.2 C230.2 C231.2 C232.2 C233.2 C234.2 C235.2 C242.2 C243.2 C260.2 FB25.2 U1.3
9690_AVDD2_PG: "U24_SPI IO extender1.19" U33.5
9690_AVDD3: C174.2 C262.2 C263.2 C264.2 C265.2 C266.2 C267.2 C268.2 C269.2 L21.2 U1.4
9690_CS: R34.2 U1.37 U6.4 U8.2
9690_DRGND: C236.1 C237.1 C238.1 C239.1 C240.1 C241.1 C244.1 C245.1 C306.1 C307.1 C308.1 C309.1 FB29.1 FB30.1 FB32.1 FB33.1 FB34.1 FB36.1 FB37.1 FB38.1 FB39.1 FB40.1 FB41.1 R196.1 U1.18 U37.4
9690_DRVDD: C236.2 C237.2 C238.2 C239.2 C240.2 C241.2 C244.2 C245.2 C309.2 FB31.2 U1.19
9690_DVDD: C281.2 C282.2 C283.2 C284.2 C285.2 C286.2 C287.2 C288.2 C296.2 FB27.2 U1.15
9690_DVDD1_PG: "U24_SPI IO extender1.20" U36.5
9690_Fast_Detect: U1.17 U4.4
9690_PDWN: "U24_SPI IO extender1.1" U1.14
9690_SPIVDD: C201.2 C289.2 C290.2 U1.13 U30.1
9690_V_1P0: C291.2 U1.12
+3.3V: "R170_SPI IO extender5.2" "R171_SPI IO extender5.2" "U24_SPI IO extender5.5" P1.A9 P1.A10 P1.B8 R2.2 R4.2 R6.2 R205.2 R206.2 U41.6
+12V: P1.A2 P1.A3 P1.B1 P1.B2 P1.B3 R204.1 U41.10
AGND: C64.2 C65.2 C72.1 C73.1 C171.1 C172.1 C173.1 C174.1 C187.1 C188.1 C195.1 C202.2 C203.2 C204.2 C205.2 C206.2 C207.2 C209.1 C210.1 C211.1 C212.1 C213.1 C214.1 C215.1 C217.1 C218.1 C221.1 C222.1 C223.1 C224.1 C225.1 C226.1 C227.1 C228.1 C229.1 C230.1 C231.1 C232.1 C233.1 C234.1 C235.1 C242.1 C243.1 C246.1 C247.1 C248.1 C249.1 C250.1 C251.1 C252.1 C253.1 C254.1 C255.1 C256.1 C257.1 C258.1 C259.1 C260.1 C262.1 C263.1 C264.1 C265.1 C266.1 C267.1 C268.1 C269.1 C270.2 C279.1 C280.1 C289.1 C290.1 C291.1 C293.2 C310.2 C311.2 C312.1 C313.1 C314.1 C315.1 C316.1 C317.1 C318.1 C319.1 C320.1 C321.1 C322.1 C323.1 C324.1 C325.1 C326.1 C327.1 C329.2 C330.1 C331.1 C332.1 C333.1 C334.1 C335.1 C336.1 C337.1 C338.1 C339.1 C340.1 C341.1 C342.1 C343.1 C344.1 C345.1 C346.1 C347.1 C348.1 C349.1 C350.1 C351.1 C352.1 C353.1 C354.1 C355.1 C356.1 C357.1 C358.1 C359.1 C360.1 C361.1 C362.1 C363.1 C364.1 C365.1 C366.1 C367.1 C371.1 C372.1 C373.1 C374.1 C375.1 C376.1 C377.1 C378.1 C379.1 C380.1 C381.1 C382.1 C383.1 C384.1 C385.1 C386.1 C391.1 C392.1 C393.1 C396.1 C397.1 C398.1 FB30.2 FB32.2 FB33.2 FB34.2 FB35.2 FB36.2 FB37.2 FB38.2 FB39.2 FB40.2 FB41.2 FB55.2 J17.1 J17.3 R174.1 R179.1 R188.1 R190.1 R199.1 R208.1 R210.1 U1.65 U2.2 U3.57 U13.29 U26.4 U28.4 U29.3 U29.7 U31.3 U31.7 U33.6 U33.17 U34.6 U34.17 U38.6 U38.17 U42.3 U42.9 U43.3 U43.9
  other v1: 507.249,15.05 565.249,15.05 506.249,16.25 507.249,16.25 508.249,16.25 564.249,16.25 565.249,16.25 566.249,16.25 507.249,17.45 565.249,17.45 91.45,21.45 92.55,21.45 93.65,21.45 94.75,21.45 95.85,21.45 96.95,21.45 98.05,21.45 91.45,22.55 92.55,22.55 93.65,22.55 94.75,22.55 95.85,22.55 96.95,22.55 98.05,22.55 91.45,23.65 92.55,23.65 93.65,23.65 94.75,23.65 95.85,23.65 96.95,23.65 98.05,23.65 91.45,24.75 92.55,24.75 93.65,24.75 94.75,24.75 95.85,24.75 96.95,24.75 98.05,24.75 91.45,25.85 92.55,25.85 93.65,25.85 94.75,25.85 95.85,25.85 96.95,25.85 98.05,25.85 91.45,26.95 92.55,26.95 93.65,26.95 94.75,26.95 95.85,26.95 96.95,26.95 98.05,26.95 91.45,28.05 92.55,28.05 93.65,28.05 94.75,28.05 95.85,28.05 96.95,28.05 98.05,28.05 32.525,43.7 33.625,43.7 23.45,43.9 24.55,43.9 25.65,43.9 32.525,44.8 33.625,44.8 23.45,45 24.55,45 25.65,45 23.45,46.1 24.55,46.1 25.65,46.1 565.949,117.45 567.049,117.45 740.698,117.45 741.798,117.45 565.949,118.55 567.049,118.55 740.698,118.55 741.798,118.55
  other v2: 605.999,151.999 787.498,151.999
AIn_2122A_N: R115.1 R117.2 U2.4
AIn_2122A_P: R112.2 R115.2 U2.3
AIn_2122B_N: R122.1 R124.2 U2.9
AIn_2122B_P: R120.2 R122.2 U2.10
AIn_9690_N: R101.2 U1.5